# Altium PCB NB3000XN.PcbDoc (part 43 of 71)
Units mil, origin at the board's own origin, x right, y up, seen from the top; angles counter-clockwise.
Board outline 9527.56 x 6929.77 mil, 6 copper layers (Top Layer, GND+SHIELD, MidLayer1, MidLayer2, P2 - 3V3+5V0, Bottom Layer), stack 62.375 mil thick; 832 components, 1027 nets, 4655 pads, 4981 vias.
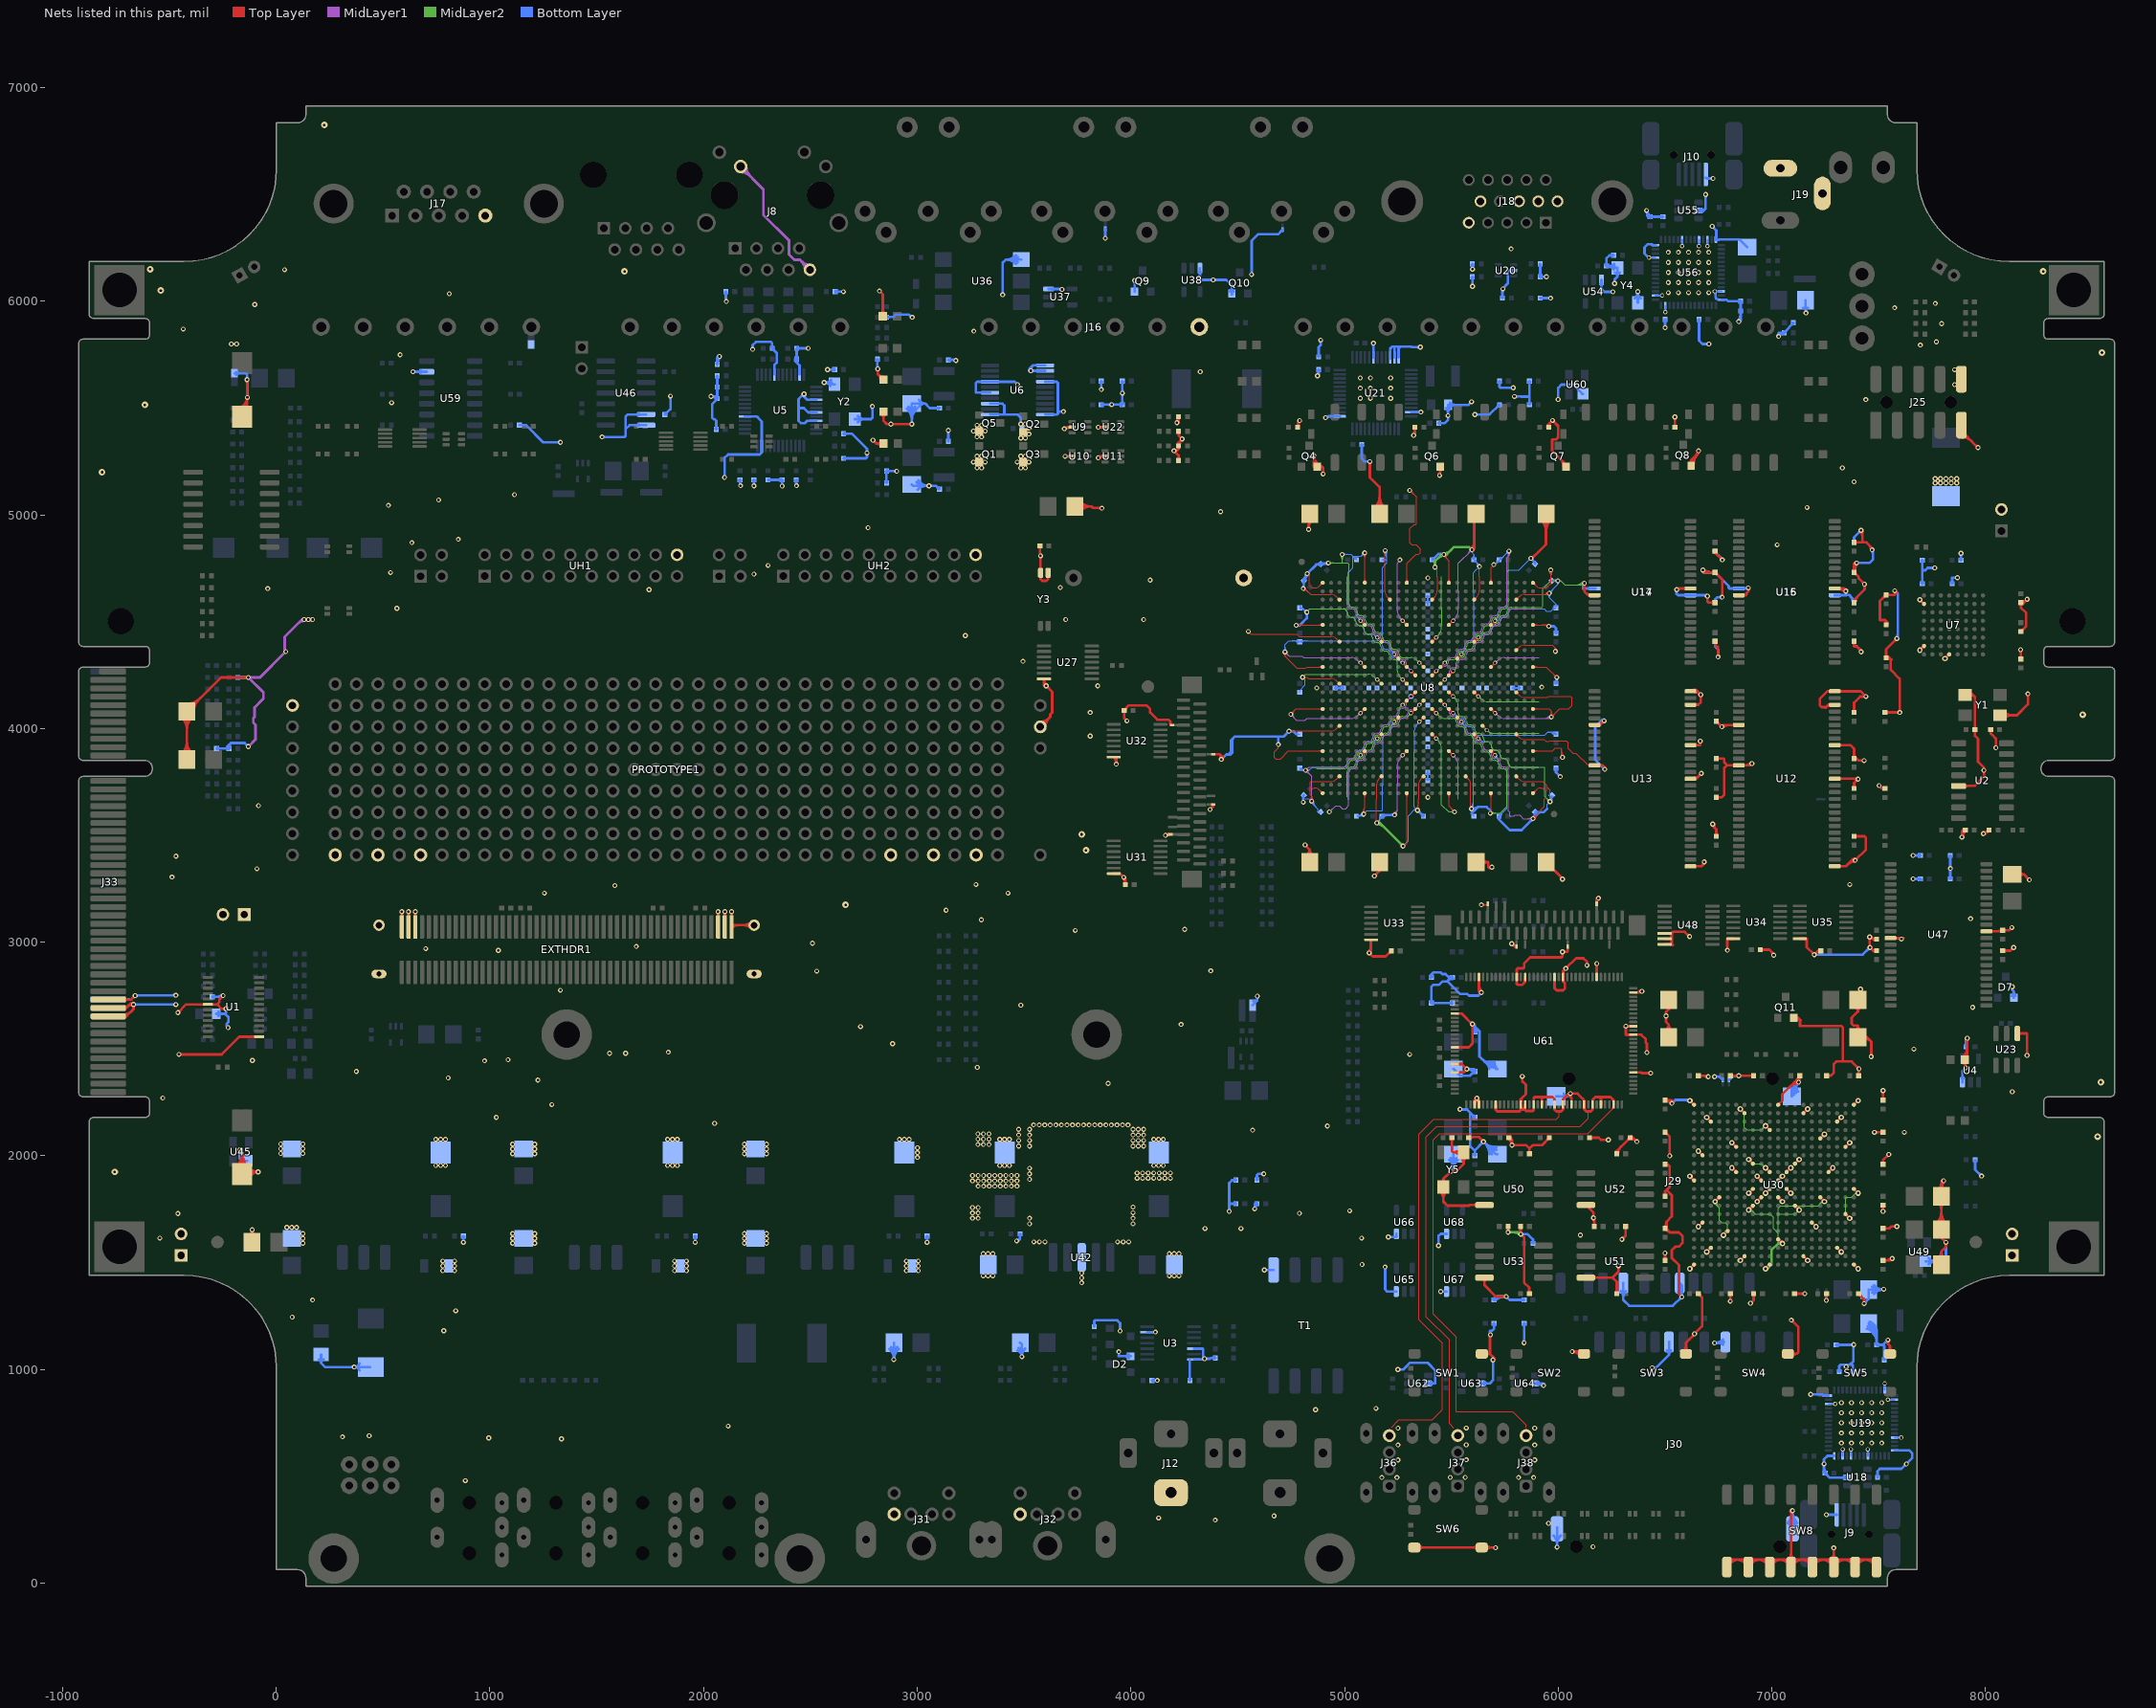
[diagram p47: the nets of this part, all layers, seen from the top]

## Via types
v1: diameter 23, hole 11.81, Top Layer to Bottom Layer, 3672 vias
v2: diameter 26, hole 11.81, Top Layer to Bottom Layer, 461 vias
v3: diameter 19, hole 11.81, Top Layer to Bottom Layer, tented both sides, 396 vias
v4: diameter 23.62, hole 11.81, Top Layer to Bottom Layer, 288 vias
v5: diameter 20, hole 11.81, Top Layer to Bottom Layer, 91 vias
v6: diameter 23, hole 11.81, Top Layer to Bottom Layer, tented both sides, 50 vias
v7: diameter 31, hole 11.81, Top Layer to Bottom Layer, 15 vias
v8: diameter 27.56, hole 11.81, Top Layer to Bottom Layer, tented both sides, 4 vias
v9: diameter 29, hole 11.81, Top Layer to Bottom Layer, 3 vias
v10: diameter 21, hole 11.81, Top Layer to Bottom Layer, 1 vias

## Nets (pads, with @x,y where several pads share a name; then routed paths per layer and width w, separated by ;. In a path a pad name is that pad's centre, name@x,y a point inside that pad or via, vN(x,y) a via of type N, cw(c..) or ccw(c..) an arc to the next point about the centre after c; other vN are vias at no path point) (continued)
GND: (continued)
  Top Layer w12: v1@7428.36,4676.04 ccw(c7415.08,4676.04) 7424.47,4685.43 ccw(c7433.86,4694.82) v1@7433.86,4681.54 ; 7428.54,110.71 cw(c7428.54,40.04) SW8.8@7478.51,90.01 ; v1@7429.97,4672.15 cw(c7420.58,4662.76) 7433.86,4662.76 cw(c7447.14,4662.76) v1@7437.75,4672.15 ; 7430.75,4159.56 cw(c7421.23,4150.04) v1@7434.69,4150.04 ; 7430.93,4159.38 ccw(c7440.19,4168.64) v1@7440.19,4155.54 ; C201.2@7435.5,2547.45 cw(c7445,2545.25) 7445,2555 ; C201.2@7435.5,2562.55 ccw(c7445,2564.75) 7445,2555 ; v1@7436.3,4146.15 ccw(c7426.91,4136.76) 7426.91,4150.04 ccw(c7426.91,4163.32) v1@7436.3,4153.93 ; v1@7453.64,3020.49 cw(c7444.25,3011.1) 7457.52,3011.1 cw(c7470.8,3011.1) v1@7461.41,3020.49 ; 7454.4,4859.83 cw(c7431.17,4836.6) v1@7464.02,4836.6 ; 7457.51,110.71 cw(c7457.51,69.01) SW8.8@7487,98.5 ; 7457.52,2992.34 ccw(c7476.49,2992.34) v1@7463.08,2978.93 ; v1@7457.73,3018.88 cw(c7458.78,2990.3) C156.2@7479,3010.52 ; v1@7461.3,2468.6 ccw(c7451.91,2477.99) 7465.19,2477.99 ccw(c7478.47,2477.99) v1@7469.08,2468.6 ; v1(7465.19,2464.71) 7465.19,2534.81 7445,2555 ; v1@7465.19,3024.33 7475.19,3014.33 C156.2@7490,3014.33 ; v1@7465.19,3024.37 v1(7457.52,3024.37) 7457.52,2976.71 v1(7459.19,2975.04) 7463.52,2975.04 7465.19,2973.37 7465.19,2969 7473.52,2960.67 C155.2@7490,2960.67 ; v1(7469.52,4836.6) 7469.52,4844.71 7442.86,4871.37 7423.52,4871.37 ; v4(7480,2110) 7479.33,2110.67 7480,2110.67 C234.2@7520,2110.67 ; v4@7484.11,2105.89 cw(c7495.64,2094.36) 7495.64,2110.67 ; v4@7484.11,2114.11 ccw(c7492.41,2122.41) 7492.41,2110.67 ; C155.2@7485.89,2956.56 ccw(c7475.97,2946.64) 7475.97,2960.67 ccw(c7475.97,2974.7) C155.2@7485.89,2964.78 ; C156.2@7485.89,3010.22 ccw(c7475.97,3000.3) 7475.97,3014.33 ccw(c7475.97,3028.36) C156.2@7485.89,3018.44 ; SW8.8@7490,110.71 7390,110.71 SW8.6@7290,110.71 ; v1(7501.86,3733.37) v1@7505.19,3730.04 ; v1@7505.19,3729.96 7515.19,3719.96 R157.1@7530,3719.96 ; v4@7515.89,1744.11 ccw(c7505.97,1754.03) 7520,1754.03 ccw(c7534.03,1754.03) v4@7524.11,1744.11 ; C195.2@7515.89,1765.22 cw(c7505.97,1755.3) 7520,1755.3 cw(c7534.03,1755.3) C195.2@7524.11,1765.22 ; C194.2@7515.89,1964.78 ccw(c7505.97,1974.7) 7520,1974.7 ccw(c7534.03,1974.7) C194.2@7524.11,1964.78 ; C234.2@7515.89,2106.56 ccw(c7505.97,2096.64) 7505.97,2110.67 ccw(c7505.97,2124.7) C234.2@7515.89,2114.78 ; C218.2@7515.89,2264.78 ccw(c7505.97,2274.7) 7520,2274.7 ccw(c7534.03,2274.7) C218.2@7524.11,2264.78 ; v4@7515.89,2300.89 cw(c7505.97,2290.97) 7520,2290.97 cw(c7534.03,2290.97) v4@7524.11,2300.89 ; C236.2@7520,1510.67 7554.82,1510.67 v1(7563.52,1519.37) ; C220.2@7520,1660.67 7549.98,1660.67 7559.31,1670 v4(7585,1670) ; v4(7520,1740) C195.2@7520,1769.33 ; C194.2@7520,1960.67 7520,1978.71 v4(7547.7,2006.4) v4@7547.7,2002.7 ; C218.2@7520,2260.67 v4(7520,2305) ; C236.2@7524.11,1506.56 cw(c7534.03,1496.64) 7534.03,1510.67 cw(c7534.03,1524.7) C236.2@7524.11,1514.78 ; C220.2@7524.11,1656.56 cw(c7534.03,1646.64) 7534.03,1660.67 cw(c7534.03,1674.7) C220.2@7524.11,1664.78 ; C58.2@7525.08,4615.75 ccw(c7515.16,4625.67) C58.2@7529.19,4625.67 ; C58.2@7525.08,4615.75 cw(c7535,4605.83) C58.2@7535,4619.86 ; R157.1@7525.75,3716.2 ccw(c7516.67,3707.12) 7516.67,3719.96 ccw(c7516.67,3732.8) R157.1@7525.75,3723.72 ; C236.2@7529.23,1510.67 ccw(c7529.23,1553.67) v1@7559.64,1523.26 ; R155.1@7530,4076.18 7578.72,4076.18 7579.86,4075.04 v1(7598.52,4075.04) 7598.52,4233.37 7556.86,4275.04 7556.86,4325 7551.19,4330.67 C60.2@7535,4330.67 7535,4371.18 v1(7585.19,4421.37) ; C60.2@7530.89,4334.78 ccw(c7520.97,4344.7) 7535,4344.7 ccw(c7549.03,4344.7) 7539.11,4334.78 ccw(c7549.03,4344.7) 7549.03,4330.67 ccw(c7549.03,4316.64) C60.2@7539.11,4326.56 ; C59.2@7530.89,4489.78 ccw(c7520.97,4499.7) 7535,4499.7 ccw(c7549.03,4499.7) C59.2@7539.11,4489.78 ; C60.2@7532,4336.08 cw(c7538.52,4324.33) 7548.03,4333.83 ; C60.2@7533.57,4336.69 cw(c7537.55,4319.91) 7549.75,4332.1 ; R155.1@7534.25,4072.42 cw(c7543.33,4063.34) 7543.33,4076.18 cw(c7543.33,4089.02) R155.1@7534.25,4079.94 ; C59.2@7535,4485.67 7535,4503.04 7529.67,4508.37 7507.19,4508.37 7506.19,4509.37 7506.19,4597.04 7521.19,4612.04 7521.56,4612.04 7521.56,4612.23 C58.2@7535,4625.67 7572.9,4625.67 7578.23,4631 ; 7536.04,4502 cw(c7522.72,4488.69) C59.2@7541.01,4484.19 ; C60.2@7537.82,4325.59 cw(c7546.55,4309.85) 7559.28,4322.58 ; C58.2@7539.11,4621.56 cw(c7549.03,4611.64) 7549.03,4625.67 cw(c7549.03,4639.7) C58.2@7539.11,4629.78 ; v4@7541.88,2006.4 cw(c7527.86,2006.4) 7537.78,1996.48 cw(c7547.7,1986.56) v4@7547.7,2000.59 ; U47.12@7555.59,3019.25 7606.86,3019.25 7615.65,3019.25 7615.65,3019.04 7615.52,3019.04 7609.19,3012.71 7606.86,3010.37 v1(7606.86,3015.04) ; v1(7575.52,4645.04) 7581.86,4638.71 7581.86,4634.71 7578.23,4631.08 ; v1@7579.69,4421.37 cw(c7566.41,4421.37) 7575.8,4411.99 cw(c7585.19,4402.6) v1@7585.19,4415.87 ; v4@7580.89,1665.89 ccw(c7570.97,1655.97) 7570.97,1670 ccw(c7570.97,1684.03) v4@7580.89,1674.11 ; 7583.41,3019.25 cw(c7583.41,2991.6) v1@7602.97,3011.15 ; v1@7594.64,4071.15 ccw(c7585.25,4061.76) 7585.25,4075.04 ccw(c7585.25,4088.32) 7594.64,4078.93 ccw(c7585.25,4088.32) 7598.52,4088.32 ccw(c7611.8,4088.32) v1@7602.41,4078.93 ; C200.2@7769.4,1682.53 ccw(c7712.43,1739.5) 7792.99,1739.5 ; C203.2@7776.12,1522.73 ccw(c7758.86,1552.17) 7792.99,1552.17 ; C190.2@7776.12,1842.73 ccw(c7758.86,1872.17) 7792.99,1872.17 ; C200.2@7777.88,1674.05 ccw(c7741.4,1710.53) 7792.99,1710.53 ccw(c7844.58,1710.53) C200.2@7808.1,1674.05 ; C190.2@7780.37,1775.17 cw(c7772.69,1756.38) 7792.99,1756.38 ; C203.2@7792.99,1490 7792.99,1552.18 ; 7792.99,1739.5 ccw(c7873.55,1739.5) C200.2@7816.59,1682.53 ; C190.2@7792.99,1843.06 cw(c7844.5,1843.06) v1@7808.08,1879.49 ; 7792.99,1872.03 cw(c7815.53,1872.03) v1@7799.59,1887.97 ; v1(7804.19,1883.37) 7792.99,1872.18 ; C190.2@7805.62,1775.17 ccw(c7813.3,1756.38) 7792.99,1756.38 ; v1@7809.69,1595.04 ccw(c7796.41,1595.04) 7805.8,1604.43 ccw(c7815.19,1613.82) v1@7815.19,1600.54 ; C203.2@7809.87,1522.73 cw(c7827.12,1552.17) 7792.99,1552.17 ; C190.2@7809.87,1842.73 cw(c7827.12,1872.17) 7792.99,1872.17 ; v1@7811.3,1591.15 cw(c7801.91,1581.76) 7815.19,1581.76 cw(c7828.47,1581.76) v1@7819.08,1591.15 ; U2.5@7874.17,3731.34 7948.52,3731.34 7992.52,3775.34 v1(7992.52,3804.71) 7992.52,3817.48 7981.46,3828.54 7981.28,3828.54 7965.19,3844.64 7965.19,3952.04 7950.86,3966.37 ; v1@7886.3,3495.6 ccw(c7876.91,3504.99) 7890.19,3504.99 ccw(c7903.47,3504.99) v1@7894.08,3495.6 ; J25.9@7886.99,5363.75 cw(c7886.99,5293.12) 7936.93,5343.07 ; J25.9@7886.99,5375.75 cw(c7886.99,5334.1) 7916.45,5363.55 ; J25.9@7886.99,5420.25 7886.99,5393.01 v4(7965,5315) ; v1@7890.19,3488.16 cw(c7926.6,3488.16) C35.2@7908.82,3519.93 ; v1@7890.19,3502.67 cw(c7906.72,3502.67) C35.2@7906.17,3519.19 ; 7890.19,3508.63 cw(c7915.14,3508.63) C35.2@7902.95,3530.4 ; 7890.19,3515.08 cw(c7906.31,3515.08) C35.2@7905.77,3531.19 ; v1@7890.52,3491.71 v1(7890.19,3491.71) 7890.19,3509.21 C35.2@7905.98,3525 ; LED1.2@7893.79,2440.32 cw(c7870.43,2416.96) 7903.47,2416.96 cw(c7936.5,2416.96) LED1.2@7913.14,2440.32 ; LED1.2@7893.79,2459.68 ccw(c7842.92,2510.54) 7914.86,2510.54 ; C35.2@7900.17,3525 cw(c7886.14,3525) 7896.06,3515.08 cw(c7905.98,3505.16) C35.2@7905.98,3519.19 ; U2.5@7901.33,3725.84 cw(c7914.61,3712.56) 7914.61,3731.34 cw(c7914.61,3750.12) U2.5@7901.33,3736.84 ; LED1.2@7902.27,2451.19 ccw(c7871.9,2481.57) 7914.86,2481.57 ; LED1.2@7903.47,2433.51 ccw(c7928.32,2433.51) v1@7910.75,2415.93 ; Y1.4@7904.88,4157.5 7940.34,4157.5 ; J25.9@7905.99,5382.75 ccw(c7927.11,5382.75) 7912.18,5367.82 ; v1(7906.86,2412.04) 7906.86,2413.37 7903.52,2416.71 7903.47,2416.71 LED1.2@7903.47,2450 7914.86,2461.39 v1(7914.86,2550.71) ; Y1.4@7907.14,4159.3 cw(c7922.84,4143.06) 7938.8,4159.03 ; Y1.4@7907.7,4159.71 cw(c7921.98,4132.88) 7943.47,4154.37 ; v1@7910.97,2546.82 cw(c7901.58,2537.43) 7914.86,2537.43 cw(c7928.14,2537.43) v1@7918.75,2546.82 ; Y1.4@7915.48,4150.67 cw(c7931.32,4134.29) 7947.43,4150.4 ; Y1.4@7928.91,4149.69 cw(c7940.33,4145.24) 7940.33,4157.5 ; Y1.4@7928.91,4165.31 ccw(c7940.33,4169.76) 7940.33,4157.5 ; C33.2@7946.56,3999.11 ccw(c7936.64,4009.03) 7950.67,4009.03 ccw(c7964.7,4009.03) C33.2@7954.78,3999.11 ; v4@7959.19,5315 ccw(c7945.16,5315) 7955.08,5324.92 ccw(c7965,5334.84) v4@7965,5320.81 ; v1@7988.64,3800.82 cw(c7979.25,3791.43) 7992.52,3791.43 cw(c8005.8,3791.43) v1@7996.41,3800.82 ; v1@7990.19,3505.04 v1(7990.19,3508.37) 8000.53,3508.37 R30.2@8017.15,3525 ; v1@7990.2,3513.87 ccw(c7990.29,3551.85) R30.2@8017.15,3525 ; U47.34@8004.41,3050.75 8075.08,3050.75 C153.2@8080,3055.67 8110.82,3055.67 v1(8123.52,3068.37) ; R30.2@8007.23,3515.08 cw(c8017.15,3505.16) R30.2@8017.15,3519.19 ; R30.2@8008.42,3516.27 ccw(c8000.18,3524.51) R30.2@8011.83,3524.51 ; C34.2@8020.22,3990.89 cw(c8010.3,3980.97) 8024.33,3980.97 cw(c8038.36,3980.97) C34.2@8028.44,3990.89 ; C34.2@8024.33,3995 8024.33,3977.37 8031.66,3970.04 8031.86,3970.04 8048.52,3953.37 v1(8048.52,3910) ; v1@8044.64,3913.89 ccw(c8035.25,3923.28) 8048.52,3923.28 ccw(c8061.8,3923.28) v1@8052.41,3913.89 ; 8054.09,3050.75 ccw(c8054.09,3081.58) C153.2@8075.89,3059.78 ; Y1.2@8067.88,4062.5 8147.5,4062.5 8198.52,4113.52 v1(8198.52,4162.37) ; C154.2@8080,2960.67 8117.49,2960.67 v1(8131.86,2975.04) ; C154.2@8084.11,2956.56 cw(c8094.03,2946.64) 8094.03,2960.67 cw(c8094.03,2974.7) C154.2@8084.11,2964.78 ; C153.2@8084.11,3051.56 cw(c8094.03,3041.64) 8094.03,3055.67 cw(c8094.03,3069.7) C153.2@8084.11,3059.78 ; Y1.2@8087.08,4047.3 cw(c8123.78,4010.59) 8123.78,4062.5 cw(c8123.78,4114.41) Y1.2@8087.08,4077.7 ; C36.2@8125,3317.99 8178.91,3317.99 ; U23.1@8151.81,2570 U23.1@8149,2572.81 8192.19,2572.81 8195,2570 v4(8195,2470) ; U23.1@8153.81,2568.01 cw(c8165.41,2556.4) 8165.41,2572.81 cw(c8165.41,2589.22) U23.1@8153.81,2577.62 ; C36.2@8159.76,3305.21 cw(c8178.9,3297.27) 8178.9,3317.99 ; C36.2@8159.76,3330.78 ccw(c8178.9,3338.72) 8178.9,3317.99 ; v1@8160.64,4365.49 cw(c8150.1,4354.95) 8165,4354.95 ; C57.2@8160.89,4329.78 ccw(c8150.97,4339.7) 8165,4339.7 ccw(c8179.03,4339.7) C57.2@8169.11,4329.78 ; C55.2@8160.89,4585.22 cw(c8150.97,4575.3) 8165,4575.3 cw(c8179.03,4575.3) 8169.11,4585.22 cw(c8179.03,4575.3) 8179.03,4589.33 cw(c8179.03,4603.36) C55.2@8169.11,4593.44 ; C55.2@8164.25,4583.19 ccw(c8166.2,4599.17) 8177.59,4587.79 ; v1(8164.52,4369.37) 8165,4370.04 8165,4369.37 C57.2@8165,4325.67 ; 8165,4357.25 cw(c8176.65,4357.25) v1@8168.41,4365.49 ; C55.2@8165.71,4595.1 ccw(c8170,4630.19) v1(8195,4605.19) 8179.14,4589.33 C55.2@8165,4589.33 8165,4566.71 8165.19,4566.71 8190.19,4541.71 8190.19,4479.37 8190.04,4479.37 8185.71,4475.04 ; C56.2@8174.82,4464 ccw(c8184.48,4454.33) 8170.81,4454.33 cw(c8184.84,4454.33) 8174.92,4464.25 cw(c8165,4474.17) 8165,4460.14 ccw(c8165,4474.53) C56.2@8175.17,4464.35 ; v4@8190.89,2474.11 ccw(c8180.97,2484.03) 8195,2484.03 ccw(c8209.03,2484.03) v4@8199.11,2474.11 ; v1@8194.64,4158.49 cw(c8185.25,4149.1) 8198.52,4149.1 cw(c8211.8,4149.1) v1@8202.41,4158.49 ; v1@8199.69,3291.71 ccw(c8186.41,3291.71) 8195.8,3301.1 ccw(c8205.19,3310.49) v1@8205.19,3297.21 ; v1(8205.19,3291.71) 8178.91,3317.99 ; -701.48,2652.86 -668.14,2686.19 v1(-668.14,2708.37) -685.48,2708.37 ; -701.48,2692.23 -701.48,2692.37 -685.48,2708.37 ; -159.72,2016.62 -159.72,1935.99 -148.78,1925.04 v1(-84.81,1925.04) ; 4223.82,5308.37 R93.1@4223.82,5323.33 4223.82,5339 v1(4240.19,5355.37) ; 4418.86,3876 4423.52,3871.33 v1(4423.52,3855.71) 4418.86,3860.37 4418.86,3876 ; Y5.2@5462.5,1855.99 5465.19,1858.68 Y5.2@5462.5,1858.68 ; Y5.2@5462.5,1855.99 Y5.2@5462.5,1858.68 ; Y5.2@5462.5,1858.68 5462.5,1892.02 ; 5462.5,1892.02 v1(5498.52,1928.04) 5523.52,1928.04 5557.5,1962.02 ; 5508.5,2016.5 Y5.4@5557.5,2016.5 5557.5,1962.02 ; U61.3@5609.37,2253.19 ccw(c5601.4,2270) v4(5620,2270) ccw(c5640.12,2270) U61.4@5629.06,2253.19 ; U61.3@5609.37,2253.19 cw(c5620,2248.92) v4@5620,2260.37 ; U61.3@5609.37,2253.19 cw(c5620,2248.92) v4@5620,2260.37 ; v4@5620,2260.37 cw(c5620,2251.08) U61.4@5629.05,2253.19 ; v4@5620,2260.37 cw(c5620,2251.08) U61.4@5629.05,2253.19 ; 5823.52,2211.95 5825.91,2214.33 ; 5823.52,2211.95 5825.91,2214.33 ; 5825.91,2214.33 5827.91,2216.33 ; 5827.91,2216.33 5843.59,2216.33 ; 5843.59,2216.33 5845.59,2214.33 ; 5845.59,2214.33 5849.54,2210.37 5881.86,2210.37 5884.96,2213.48 U61.17@5884.96,2240 5884.96,2269.81 5890.19,2275.04 5924.33,2275.04 ; 5864.6,1382.45 5865.52,1383.37 5865.67,1383.37 5865.67,1381.37 ; 5864.6,1382.45 5865.67,1381.37 ; 5865.67,2034.54 5869.84,2038.71 ; 5924.33,2275.04 5974.52,2275.04 5981.86,2267.71 5981.86,2218.24 5983.39,2216.71 ; C279.2@5943.52,3374.47 5943.52,3375 C279.2@5942.99,3375 C279.2@5943.52,3374.47 ; 5983.39,2216.71 5991.72,2208.37 6005,2208.37 6014.42,2208.37 6022.76,2216.71 ; 6022.76,2216.71 6022.76,2265.37 6049.09,2291.71 v1(6056.86,2291.71) ; 6160.55,2216.71 6160.55,2261.4 6174.19,2275.04 ; 6174.19,2275.04 6174.86,2275.71 6190.92,2275.71 6191.59,2275.04 ; 6174.19,2275.04 6191.59,2275.04 ; 6316.52,2567.57 v1@6316.52,2606.94 ; v1@6316.52,2606.94 6316.42,2606.94 v1(6316.52,2607.04) v1@6316.52,2606.94 ; 6375,2764.42 v1@6380.62,2770.04 ; 6500.19,1833.37 6506.86,1840.04 6531.86,1815.04 6531.86,1716.71 6506.86,1691.71 6506.86,1660.67 C246.2@6506.86,1658.37 ; 6500.19,1833.37 6522.19,1855.37 6522.19,1950.33 6511.86,1960.67 ; C246.2@6502.29,1658.37 C246.2@6506.86,1653.81 ; C246.2@6502.29,1658.37 C246.2@6500,1660.67 6500,1658.37 C246.2@6502.29,1658.37 ; C246.2@6502.29,1658.37 C246.2@6506.86,1658.37 ; v4(6505,2655) 6505,2672.99 6517.01,2685 ; C246.2@6506.86,1653.81 6515.19,1645.48 6515.19,1645.37 6506.86,1653.71 C246.2@6506.86,1653.81 ; C246.2@6506.86,1653.81 C246.2@6506.86,1658.37 ; 6531.97,3016.02 6531.97,3041.61 ; 6531.97,3041.61 6538.73,3048.37 ; 6622.4,5255.04 6622.52,5255.04 v1@6656.86,5289.37 ; 7123.52,2645.79 7131.86,2637.45 7131.86,2608.37 7324.86,2608.37 7331.86,2601.37 7331.86,2441.71 ; 7290.19,2390 7290.19,2430.37 7301.52,2441.71 7331.86,2441.71 ; 7331.86,2441.71 7373.52,2441.71 v1(7407.86,2407.37) v1@7413.34,2407.37 ; 7402.99,2608.37 C201.2@7402.99,2555 7445,2555 ; 7402.99,2608.37 7401.99,2609.37 7381.86,2609.37 7373.52,2617.71 7373.52,2646.37 7402.86,2675.71 7402.99,2675.71 ; C58.2@7529.19,4625.67 cw(c7515.6,4625.67) 7525.21,4616.06 ccw(c7515.6,4625.67) C58.2@7529.19,4625.67 ; C58.2@7535,4619.86 ccw(c7535,4605.39) 7524.77,4615.62 cw(c7535,4605.39) C58.2@7535,4619.86 ; 7792.99,1552.18 7815.19,1574.37 v1(7815.19,1595.04) 7792.99,1617.24 C200.2@7792.99,1655 7792.99,1755.37 7791.99,1755.37 7792.99,1756.37 ; 7792.99,1756.37 C190.2@7792.99,1810 7792.99,1872.18 ; 7940.34,4157.5 7950.67,4147.17 C33.2@7950.67,3995 ; 7950.67,3966.56 C33.2@7950.67,3995 ; 7950.67,3966.56 C33.2@7950.67,3995 ; 7950.67,3966.56 7950.67,3966.37 7950.86,3966.37 ; 7950.67,3966.56 7950.86,3966.37 ; 7950.67,3980.97 cw(c7964.7,3980.97) 7954.78,3990.89 ccw(c7964.7,3980.97) 7950.67,3980.97 ; 7950.67,3980.97 ccw(c7936.64,3980.97) 7946.56,3990.89 cw(c7936.64,3980.97) 7950.67,3980.97 ; 8185.71,4475.04 C56.2@8165,4454.33 8165,4454.18 8165.07,4454.26 8185.86,4475.04 8185.71,4475.04
  MidLayer1 w4: v1@4721.19,4348.87 cw(c4721.19,4325.94) 4737.41,4342.16 cw(c4753.63,4358.37) v1@4730.69,4358.37 ; v1@4721.19,4352.87 cw(c4721.19,4339.6) 4730.58,4348.99 cw(c4739.97,4358.37) v1@4726.69,4358.37 ; v1(4721.19,4358.37) 4741.56,4338 4802.63,4338 4808.65,4331.97 4860,4331.97 4870,4331.97 5031.66,4331.97 cw(c5031.66,4290.24) 5061.17,4319.75 ; v1@4748.52,4057.21 cw(c4748.52,4034.27) 4764.74,4050.49 cw(c4780.96,4066.71) v1@4758.02,4066.71 ; v1@4748.52,4061.21 cw(c4748.52,4047.93) 4757.91,4057.32 cw(c4767.3,4066.71) v1@4754.02,4066.71 ; v1(4748.52,4066.71) 4776.02,4039.21 4815.83,4039.21 4824.65,4048.03 4860,4048.03 4870,4048.03 4918.62,4048.03 4938.04,4048.03 5012.16,4048.03 ; v1@4817.86,3795.54 cw(c4817.86,3772.61) 4834.07,3788.82 cw(c4850.29,3805.04) v1@4827.36,3805.04 ; v1@4817.86,3799.54 cw(c4817.86,3786.26) 4827.25,3795.65 cw(c4836.64,3805.04) v1@4823.36,3805.04 ; v1@4839.47,3666.76 ccw(c4823.26,3682.98) 4846.19,3682.98 ccw(c4869.13,3682.98) v1@4852.91,3666.76 ; v1@4842.3,3663.93 ccw(c4832.91,3673.32) 4846.19,3673.32 ccw(c4859.47,3673.32) v1@4850.08,3663.93 ; v1(4846.19,3660.04) 4846.19,3776.71 v1(4817.86,3805.04) 4832.88,3820.07 4855.26,3820.07 4860,3820.07 4870,3820.07 4879.78,3820.07 4938.04,3820.07 4996.3,3820.07 ccw(c4996.3,3835.67) 5011.9,3835.67 cw(c5035.67,3835.67) 5035.67,3859.44 ccw(c5035.67,3875.04) 5051.27,3875.04 cw(c5075.04,3875.04) 5075.04,3898.81 ccw(c5075.04,3914.41) 5090.64,3914.41 cw(c5114.41,3914.41) 5114.41,3938.18 ccw(c5114.41,3953.78) 5130.01,3953.78 cw(c5153.78,3953.78) 5153.78,3977.55 ccw(c5153.78,3993.15) 5169.38,3993.15 cw(c5193.15,3993.15) 5193.15,4016.92 ccw(c5193.15,4032.52) 5208.75,4032.52 cw(c5232.52,4032.52) 5232.52,4056.29 ccw(c5232.52,4071.89) 5248.12,4071.89 cw(c5271.89,4071.89) 5271.89,4095.66 ccw(c5271.89,4111.26) 5287.49,4111.26 ; v1(4928.86,3609.71) 4929.77,3609.71 4957.94,3637.87 4977.13,3637.87 4990,3625 5005,3625 5020.07,3640.07 5020.07,3660 5020.07,3670 5020.07,3679.78 5020.07,3738.04 5020.07,3796.3 cw(c5035.67,3796.3) 5035.67,3811.9 ccw(c5035.67,3835.67) 5059.44,3835.67 cw(c5075.04,3835.67) 5075.04,3851.27 ccw(c5075.04,3875.04) 5098.81,3875.04 cw(c5114.41,3875.04) 5114.41,3890.64 ccw(c5114.41,3914.41) 5138.18,3914.41 cw(c5153.78,3914.41) 5153.78,3930.01 ccw(c5153.78,3953.78) 5177.55,3953.78 cw(c5193.15,3953.78) 5193.15,3969.38 ccw(c5193.15,3993.15) 5216.92,3993.15 cw(c5232.52,3993.15) 5232.52,4008.75 ccw(c5232.52,4032.52) 5256.29,4032.52 cw(c5271.89,4032.52) 5271.89,4048.12 ccw(c5271.89,4071.89) 5295.66,4071.89 cw(c5311.26,4071.89) 5311.26,4087.49 ; v1@4928.86,3615.21 ccw(c4928.86,3630.7) 4939.81,3619.75 ; v1@4928.86,3619.21 ccw(c4928.86,3644.36) 4946.64,3626.57 ; v1@4934.36,3609.71 cw(c4945.42,3609.71) 4937.6,3617.53 ; v1@4938.36,3609.71 cw(c4959.08,3609.71) 4944.43,3624.36 ; 4998.23,4048.03 5012.16,4048.03 ; 5011.9,4710 5011.9,4700.22 5011.9,4641.96 5011.9,4583.7 ccw(c5035.67,4583.7) 5035.67,4559.93 cw(c5035.67,4544.33) 5051.27,4544.33 ccw(c5075.04,4544.33) 5075.04,4520.56 cw(c5075.04,4504.96) 5090.64,4504.96 ccw(c5114.41,4504.96) 5114.41,4481.19 cw(c5114.41,4465.59) 5130.01,4465.59 ccw(c5153.78,4465.59) 5153.78,4441.82 cw(c5153.78,4426.22) 5169.38,4426.22 ccw(c5193.15,4426.22) 5193.15,4402.45 cw(c5193.15,4386.85) 5208.75,4386.85 ccw(c5232.52,4386.85) 5232.52,4363.08 cw(c5232.52,4347.48) 5248.12,4347.48 ccw(c5271.89,4347.48) 5271.89,4323.71 cw(c5271.89,4308.11) 5287.49,4308.11 ccw(c5311.26,4308.11) 5294.45,4291.3 5300.87,4283.57 ; v3@5067.57,4072.54 cw(c5049.53,4074.12) 5061.17,4060.25 ; v3@5067.57,4307.46 ccw(c5049.53,4305.88) 5061.17,4319.75 ; v3@5074.39,4064.42 ccw(c5072.81,4046.38) 5061.17,4060.25 ; v3@5074.39,4315.58 cw(c5072.81,4333.62) 5061.17,4319.75 ; v1@5234.52,3604.37 5248.03,3617.88 ; v1@5235.95,3596.51 cw(c5247.29,3600.25) 5238.84,3608.69 ; v1@5239.75,3597.76 cw(c5254.19,3602.53) 5243.44,3613.29 ; v1@5243.55,3599.02 cw(c5261.1,3604.81) 5248.03,3617.88 ; 5248.03,3798.23 5248.03,3812.16 ; 5248.03,4581.77 5248.03,4567.84 ; 5251.36,4775.54 ccw(c5247.01,4779.89) v1@5251.8,4783.74 ; 5253.78,4777.97 cw(c5259.19,4772.56) v1@5259.19,4780.21 ; 5254.5,4778.69 ccw(c5250.5,4782.7) v1@5254.91,4786.26 ; v1(5259.19,4789.71) 5259.19,4783.37 5248.19,4772.37 5248.03,4772.37 5248.03,4724.74 5248.03,4720 5248.03,4710 5248.03,4661.38 5248.03,4641.96 5248.03,4567.84 ; v3@5264.42,3874.39 cw(c5246.38,3872.81) 5260.25,3861.17 ; v3@5264.42,4505.61 ccw(c5246.38,4507.19) 5260.25,4518.83 ; v3@5272.54,3867.57 ccw(c5274.12,3849.53) 5260.25,3861.17 ; v3@5272.54,4512.43 cw(c5274.12,4530.47) 5260.25,4518.83 ; 5287.4,4110.75 cw(c5326.07,4110.75) 5298.73,4138.1 ; v3@5303.87,4270.04 ccw(c5286.04,4273.19) 5300.87,4283.57 ; v3@5303.92,4150.63 cw(c5286.19,4150.63) 5298.73,4138.1 ; 5310.75,4087.4 ccw(c5310.75,4126.07) 5338.1,4098.73 ; v3@5311.26,4143.29 ccw(c5311.26,4125.56) 5298.73,4138.1 ; v3@5312.56,4276.13 cw(c5315.71,4293.96) 5300.87,4283.57 ; v3@5343.29,4111.26 cw(c5325.56,4111.26) 5338.1,4098.73 ; v3@5350.63,4103.92 ccw(c5350.63,4086.19) 5338.1,4098.73 ; v3@5429.37,4276.08 ccw(c5429.37,4293.81) 5441.9,4281.27 ; v3@5436.71,4268.74 cw(c5454.44,4268.74) 5441.9,4281.27 ; v3@5467.44,4103.87 cw(c5464.29,4086.04) 5479.13,4096.43 ; v3@5468.74,4236.71 ccw(c5468.74,4254.44) 5481.27,4241.9 ; 5468.74,4292.51 ccw(c5468.74,4308.11) 5484.34,4308.11 cw(c5508.11,4308.11) 5508.11,4331.88 ccw(c5508.11,4347.48) 5523.71,4347.48 cw(c5547.48,4347.48) 5547.48,4371.25 ccw(c5547.48,4386.85) 5563.08,4386.85 cw(c5586.85,4386.85) 5586.85,4410.62 ccw(c5586.85,4426.22) 5602.45,4426.22 cw(c5626.22,4426.22) 5626.22,4449.99 ccw(c5626.22,4465.59) 5641.82,4465.59 cw(c5665.59,4465.59) 5665.59,4489.36 ccw(c5665.59,4504.96) 5681.19,4504.96 cw(c5704.96,4504.96) 5704.96,4528.73 ccw(c5704.96,4544.33) 5720.56,4544.33 cw(c5744.33,4544.33) 5744.33,4568.1 ccw(c5744.33,4583.7) 5759.93,4583.7 5759.93,4641.96 5759.93,4700.22 5759.93,4710 5759.93,4720 5759.93,4724.74 5759.93,4800 5769.86,4809.93 ; 5469.25,4292.6 ccw(c5469.25,4253.93) 5441.9,4281.27 ; v3@5476.08,4229.37 cw(c5493.81,4229.37) 5481.27,4241.9 ; v3@5476.13,4109.96 ccw(c5493.96,4106.81) 5479.13,4096.43 ; 5492.51,4268.74 cw(c5508.11,4268.74) 5508.11,4284.34 ccw(c5508.11,4308.11) 5531.88,4308.11 cw(c5547.48,4308.11) 5547.48,4323.71 ccw(c5547.48,4347.48) 5571.25,4347.48 cw(c5586.85,4347.48) 5586.85,4363.08 ccw(c5586.85,4386.85) 5610.62,4386.85 cw(c5626.22,4386.85) 5626.22,4402.45 ccw(c5626.22,4426.22) 5649.99,4426.22 cw(c5665.59,4426.22) 5665.59,4441.82 ccw(c5665.59,4465.59) 5689.36,4465.59 cw(c5704.96,4465.59) 5704.96,4481.19 ccw(c5704.96,4504.96) 5728.73,4504.96 cw(c5744.33,4504.96) 5744.33,4520.56 ccw(c5744.33,4544.33) 5768.1,4544.33 cw(c5783.7,4544.33) 5783.7,4559.93 5841.96,4559.93 5900.22,4559.93 5910,4559.93 ; 5492.6,4269.25 cw(c5453.93,4269.25) 5481.27,4241.9 ; v3@5507.46,3867.57 cw(c5505.88,3849.53) 5519.75,3861.17 ; v3@5507.46,4512.43 ccw(c5505.88,4530.47) 5519.75,4518.83 ; v3@5515.58,3874.39 ccw(c5533.62,3872.81) 5519.75,3861.17 ; v3@5515.58,4505.61 cw(c5533.62,4507.19) 5519.75,4518.83 ; 5531.97,3670 5531.97,3738.04 5531.97,3812.16 5531.97,3831.66 ccw(c5490.24,3831.66) 5519.75,3861.17 ; 5531.97,4581.77 5531.97,4567.84 ; v1@5586.69,4837.04 cw(c5563.76,4837.04) 5579.97,4820.82 cw(c5596.19,4804.61) v1@5596.19,4827.54 ; v1@5590.69,4837.04 cw(c5577.41,4837.04) 5586.8,4827.65 cw(c5596.19,4818.26) v1@5596.19,4831.54 ; v1(5596.19,4837.04) 5531.86,4772.71 5531.86,4764.49 5531.97,4764.49 5531.97,4724.74 5531.97,4720 5531.97,4710 5531.97,4661.38 5531.97,4641.96 5531.97,4567.84 ; v3@5705.61,4064.42 cw(c5707.19,4046.38) 5718.83,4060.25 ; v3@5705.61,4315.58 ccw(c5707.19,4333.62) 5718.83,4319.75 ; v3@5712.43,4072.54 ccw(c5730.47,4074.12) 5718.83,4060.25 ; v3@5712.43,4307.46 cw(c5730.47,4305.88) 5718.83,4319.75 ; v1@5763.56,4823.93 cw(c5751.14,4809.93) 5769.86,4809.93 ; v1@5766.21,4826.92 cw(c5759.02,4818.82) 5769.86,4818.82 cw(c5780.69,4818.82) v1@5773.51,4826.92 ; 5768.1,3655.26 5768.1,3658.37 ; v1(5769.86,4831.04) 5769.86,4809.93 ; v1@5776.16,4823.93 ccw(c5788.57,4809.93) 5769.86,4809.93 ; 5781.77,4048.03 5767.84,4048.03 ; 5781.77,4331.97 5767.84,4331.97 ; v1@5875.81,3571.66 ccw(c5859.59,3555.44) 5859.59,3578.37 ccw(c5859.59,3601.31) v1@5875.81,3585.09 ; v1@5878.64,3574.49 ccw(c5869.25,3565.1) 5869.25,3578.37 ccw(c5869.25,3591.65) v1@5878.64,3582.26 ; v1(5882.52,3578.37) 5836.63,3578.37 5820,3595 5799.39,3595 5794.39,3590 5775,3590 5773.03,3591.97 5773.03,3608.29 5768.1,3613.21 5768.1,3660 5768.1,3670 ; 5910,4331.97 5861.38,4331.97 5841.96,4331.97 5767.84,4331.97 ; 5931.21,4048.03 ccw(c5931.21,4090.36) v1@5961.14,4060.43 ; 5940.86,4048.03 ccw(c5940.86,4080.7) v1@5963.97,4057.6 ; 5950.52,4048.03 ccw(c5950.52,4071.04) v1@5966.8,4054.77 ; v1(5967.86,4053.71) 5962.18,4048.03 5924.74,4048.03 5920,4048.03 5910,4048.03 5861.38,4048.03 5841.96,4048.03 5767.84,4048.03 ; 5012.16,4048.03 5031.66,4048.03 ccw(c5031.66,4089.76) 5061.17,4060.25 ; 5248.03,3617.88 5248.03,3655.26 5248.03,3660 5248.03,3670 5248.03,3718.62 5248.03,3738.04 5248.03,3812.16 ; 5248.03,3812.16 5248.03,3831.66 cw(c5289.76,3831.66) 5260.25,3861.17 ; 5248.03,4567.84 5248.03,4548.34 ccw(c5289.76,4548.34) 5260.25,4518.83 ; 5479.13,4096.43 5485.55,4088.7 cw(c5468.74,4071.89) 5492.51,4071.89 ccw(c5508.11,4071.89) 5508.11,4056.29 cw(c5508.11,4032.52) 5531.88,4032.52 ccw(c5547.48,4032.52) 5547.48,4016.92 cw(c5547.48,3993.15) 5571.25,3993.15 ccw(c5586.85,3993.15) 5586.85,3977.55 cw(c5586.85,3953.78) 5610.62,3953.78 ccw(c5626.22,3953.78) 5626.22,3938.18 cw(c5626.22,3914.41) 5649.99,3914.41 ccw(c5665.59,3914.41) 5665.59,3898.81 cw(c5665.59,3875.04) 5689.36,3875.04 ccw(c5704.96,3875.04) 5704.96,3859.44 cw(c5704.96,3835.67) 5728.73,3835.67 ccw(c5744.33,3835.67) 5744.33,3820.07 cw(c5744.33,3796.3) 5768.1,3796.3 5768.1,3738.04 5768.1,3710 ; 5519.75,4518.83 ccw(c5490.24,4548.34) 5531.97,4548.34 5531.97,4567.84 ; 5718.83,4060.25 ccw(c5748.34,4089.76) 5748.34,4048.03 5767.84,4048.03 ; 5718.83,4319.75 cw(c5748.34,4290.24) 5748.34,4331.97 5767.84,4331.97 ; 5768.1,3670 5768.1,3710 ; 5768.1,3670 5768.1,3679.78 5768.1,3710
  MidLayer1 w12: v1(-130.48,3915.37) -96.64,3949.21 -96.64,4017.28 -97.54,4018.18 ; v1@-130.48,3920.87 ccw(c-130.48,3934.15) -121.09,3924.76 ccw(c-111.7,3915.37) v1@-124.98,3915.37 ; v1@-130.48,4233.87 cw(c-130.48,4220.6) -121.09,4229.99 cw(c-111.7,4239.37) v1@-124.98,4239.37 ; v1@-126.59,4235.49 cw(c-117.2,4226.1) -117.2,4239.37 cw(c-117.2,4252.65) v1@-126.59,4243.26 ; -97.41,4018.31 -106.5,4027.4 -106.5,4048.91 -101.5,4053.91 -101.5,4098.91 -60,4140.41 -60,4168.9 v1(-130.48,4239.37) -75.63,4239.37 40,4355 40,4430 120,4510 v4(130,4510) v4(150,4510) v4(170,4510) ; 103.01,4493.01 cw(c130,4466.02) v4@130,4504.19 ; v4@134.11,4505.89 cw(c144.03,4495.97) 144.03,4510 cw(c144.03,4524.03) v4@134.11,4514.11 ; v4@145.89,4505.89 ccw(c135.97,4495.97) 135.97,4510 ccw(c135.97,4524.03) v4@145.89,4514.11 ; v4@154.11,4505.89 cw(c164.03,4495.97) 164.03,4510 cw(c164.03,4524.03) v4@154.11,4514.11 ; v4@165.89,4505.89 ccw(c155.97,4495.97) 155.97,4510 ccw(c155.97,4524.03) v4@165.89,4514.11 ; J8.10@2173.98,6604.67 cw(c2173.98,6542.17) 2218.18,6586.37 cw(c2262.38,6630.56) J8.10@2199.87,6630.56 ; J8.10@2173.98,6616.67 cw(c2173.98,6583.14) 2197.7,6606.85 cw(c2221.41,6630.56) J8.10@2187.87,6630.56 ; J8.10@2173.98,6630.56 2280,6524.55 2280,6405 2400,6285 2400,6219.54 2425,6194.54 2450.95,6194.54 J8.8@2498,6147.49 ; J8.8@2474.47,6147.49 ccw(c2417.67,6147.49) 2457.84,6187.66 ccw(c2498,6227.82) J8.8@2498,6171.02 ; v1(5234.52,3596.04) v1@5234.52,3604.37 ; v1(6683.52,3375.71) v1@6687.52,3379.71 ; v1(6766.19,4008.37) v1@6772.19,4008.37 ; v1@8125.19,2968.37 v1(8131.86,2975.04)
  MidLayer2 w4: v1(4803.86,4240.37) 4816.71,4253.23 4856.86,4253.23 ; v1(4823.52,4544.71) 4838.75,4559.93 4855.26,4559.93 4860,4559.93 4870,4559.93 4879.78,4559.93 4938.04,4559.93 4996.3,4559.93 cw(c4996.3,4544.33) 5011.9,4544.33 ccw(c5035.67,4544.33) 5035.67,4520.56 cw(c5035.67,4504.96) 5051.27,4504.96 ccw(c5075.04,4504.96) 5075.04,4481.19 cw(c5075.04,4465.59) 5090.64,4465.59 ccw(c5114.41,4465.59) 5114.41,4441.82 cw(c5114.41,4426.22) 5130.01,4426.22 ccw(c5153.78,4426.22) 5153.78,4402.45 cw(c5153.78,4386.85) 5169.38,4386.85 ccw(c5193.15,4386.85) 5193.15,4363.08 cw(c5193.15,4347.48) 5208.75,4347.48 ccw(c5232.52,4347.48) 5232.52,4323.71 cw(c5232.52,4308.11) 5248.12,4308.11 ; v1(4846.19,3660.04) v1@4847.74,3661.59 ; 4855.26,4253.23 4860,4253.23 4870,4253.23 4997.36,4253.23 5016.78,4253.23 5090.9,4253.23 5110.4,4253.23 cw(c5110.4,4211.5) 5139.91,4241.01 ; 4870,3811.9 4879.78,3811.9 4938.04,3811.9 4996.3,3811.9 ccw(c4996.3,3835.67) 5020.07,3835.67 cw(c5035.67,3835.67) 5035.67,3851.27 ccw(c5035.67,3875.04) 5059.44,3875.04 cw(c5075.04,3875.04) 5075.04,3890.64 ccw(c5075.04,3914.41) 5098.81,3914.41 cw(c5114.41,3914.41) 5114.41,3930.01 ccw(c5114.41,3953.78) 5138.18,3953.78 cw(c5153.78,3953.78) 5153.78,3969.38 ccw(c5153.78,3993.15) 5177.55,3993.15 cw(c5193.15,3993.15) 5193.15,4008.75 ccw(c5193.15,4032.52) 5216.92,4032.52 cw(c5232.52,4032.52) 5232.52,4048.12 ccw(c5232.52,4071.89) 5256.29,4071.89 5256.29,4091.45 ; v1(4924.52,4775.04) 4988.86,4775.04 ; v1@4928.41,4771.15 cw(c4937.8,4761.76) 4937.8,4775.04 cw(c4937.8,4788.32) v1@4928.41,4778.93 ; v1@4931.24,4768.32 cw(c4947.46,4752.11) 4947.46,4775.04 cw(c4947.46,4797.98) v1@4931.24,4781.76 ; v1@4982.14,4808.32 cw(c4965.92,4792.11) 4988.86,4792.11 cw(c5011.79,4792.11) v1@4995.57,4808.32 ; v1@4984.97,4811.15 cw(c4975.58,4801.76) 4988.86,4801.76 cw(c5002.14,4801.76) v1@4992.75,4811.15 ; v1(4988.86,4815.04) 4988.86,4775.04 ; 5011.9,3679.78 5011.9,3738.04 5011.9,3796.3 cw(c5035.67,3796.3) 5035.67,3820.07 ccw(c5035.67,3835.67) 5051.27,3835.67 cw(c5075.04,3835.67) 5075.04,3859.44 ccw(c5075.04,3875.04) 5090.64,3875.04 cw(c5114.41,3875.04) 5114.41,3898.81 ccw(c5114.41,3914.41) 5130.01,3914.41 cw(c5153.78,3914.41) 5153.78,3938.18 ccw(c5153.78,3953.78) 5169.38,3953.78 cw(c5193.15,3953.78) 5193.15,3977.55 ccw(c5193.15,3993.15) 5208.75,3993.15 cw(c5232.52,3993.15) 5232.52,4016.92 ccw(c5232.52,4032.52) 5248.12,4032.52 ; v3@5146.31,4228.72 ccw(c5128.27,4227.14) 5139.91,4241.01 ; v3@5153.13,4236.84 cw(c5151.55,4254.88) 5139.91,4241.01 ; 5248.03,4308.02 5248.03,4269.25 ccw(c5286.7,4269.25) 5259.36,4241.9 ; 5255.08,4049.33 ccw(c5271.89,4032.52) 5248.12,4032.52 ; 5256.38,4091.55 cw(c5266.53,4091.55) 5259.36,4098.73 ; v3@5264.55,4111.26 cw(c5246.82,4111.26) 5259.36,4098.73 ; v3@5264.55,4229.37 ccw(c5246.82,4229.37) 5259.36,4241.9 ; v3@5271.89,4103.92 ccw(c5271.89,4086.19) 5259.36,4098.73 ; v3@5271.89,4236.71 cw(c5271.89,4254.44) 5259.36,4241.9 ; 5271.98,4331.97 5310.75,4331.97 cw(c5310.75,4293.3) 5338.1,4320.64 ; 5291.45,4056.29 5271.89,4056.29 ccw(c5271.89,4032.52) 5248.12,4032.52 ; 5291.55,4056.38 ccw(c5291.55,4066.53) 5298.73,4059.36 ; v3@5343.29,4308.11 ccw(c5325.56,4308.11) 5338.1,4320.64 ; v3@5350.63,4315.45 cw(c5350.63,4333.18) 5338.1,4320.64 ; v1(5423.52,4755.71) v1@5426.19,4758.37 ; v3@5428.72,3946.31 cw(c5427.14,3928.27) 5441.01,3939.91 ; v3@5428.72,4433.69 ccw(c5427.14,4451.73) 5441.01,4440.09 ; v3@5429.37,4064.55 cw(c5429.37,4046.82) 5441.9,4059.36 ; v3@5436.71,4071.89 ccw(c5454.44,4071.89) 5441.9,4059.36 ; v3@5436.84,3953.13 ccw(c5454.88,3951.55) 5441.01,3939.91 ; v3@5436.84,4426.87 cw(c5454.88,4428.45) 5441.01,4440.09 ; 5453.23,4710 5453.23,4582.64 5453.23,4563.22 5453.23,4489.1 5453.23,4469.6 cw(c5411.5,4469.6) 5441.01,4440.09 ; 5453.23,4813.08 5456.86,4816.71 5458.56,4815 v1(5465,4815) ; 5488.45,4323.62 ccw(c5488.45,4313.47) 5481.27,4320.64 ; 5488.55,4323.71 5508.11,4323.71 ccw(c5508.11,4347.48) 5531.88,4347.48 ; 5508.02,4048.03 5469.25,4048.03 cw(c5469.25,4086.7) 5441.9,4059.36 ; v3@5508.11,4143.29 cw(c5508.11,4125.56) 5520.64,4138.1 ; v3@5508.11,4276.08 ccw(c5508.11,4293.81) 5520.64,4281.27 ; v1@5508.28,3603.28 ccw(c5492.06,3587.06) 5492.06,3610 ccw(c5492.06,3632.93) v1@5508.28,3616.72 ; v1@5511.11,3606.11 ccw(c5501.72,3596.72) 5501.72,3610 ccw(c5501.72,3623.28) v1@5511.11,3613.89 ; v1(5515,3610) 5486.31,3610 5453.23,3643.08 5453.23,3660 5453.23,3670 5453.23,3797.36 5453.23,3816.78 5453.23,3890.9 5453.23,3910.4 ccw(c5411.5,3910.4) 5441.01,3939.91 ; v3@5515.45,4150.63 ccw(c5533.18,4150.63) 5520.64,4138.1 ; v3@5515.45,4268.74 cw(c5533.18,4268.74) 5520.64,4281.27 ; 5523.62,4288.45 cw(c5513.47,4288.45) 5520.64,4281.27 ; 5523.71,4288.55 5523.71,4308.11 cw(c5547.48,4308.11) 5547.48,4331.88 ccw(c5547.48,4347.48) 5563.08,4347.48 cw(c5586.85,4347.48) 5586.85,4371.25 ccw(c5586.85,4386.85) 5602.45,4386.85 cw(c5626.22,4386.85) 5626.22,4410.62 ccw(c5626.22,4426.22) 5641.82,4426.22 cw(c5665.59,4426.22) 5665.59,4449.99 ccw(c5665.59,4465.59) 5681.19,4465.59 cw(c5704.96,4465.59) 5704.96,4489.36 ccw(c5704.96,4504.96) 5720.56,4504.96 cw(c5744.33,4504.96) 5744.33,4528.73 ccw(c5744.33,4544.33) 5759.93,4544.33 cw(c5783.7,4544.33) 5783.7,4568.1 5841.96,4568.1 5900.22,4568.1 5910,4568.1 5920,4568.1 ; 5524.92,4330.67 ccw(c5508.11,4347.48) 5531.88,4347.48 ; 5531.88,4071.89 ccw(c5547.48,4071.89) 5547.48,4056.29 cw(c5547.48,4032.52) 5571.25,4032.52 ccw(c5586.85,4032.52) 5586.85,4016.92 cw(c5586.85,3993.15) 5610.62,3993.15 ccw(c5626.22,3993.15) 5626.22,3977.55 cw(c5626.22,3953.78) 5649.99,3953.78 ccw(c5665.59,3953.78) 5665.59,3938.18 cw(c5665.59,3914.41) 5689.36,3914.41 ccw(c5704.96,3914.41) 5704.96,3898.81 cw(c5704.96,3875.04) 5728.73,3875.04 ccw(c5744.33,3875.04) 5744.33,3859.44 cw(c5744.33,3835.67) 5768.1,3835.67 ccw(c5783.7,3835.67) 5783.7,3820.07 5841.96,3820.07 5900.22,3820.07 5910,3820.07 5920,3820.07 5924.74,3820.07 5935.19,3820.07 5936.86,3818.4 5936.86,3683.04 v1(5961.52,3658.37) ; 5531.97,4071.98 5531.97,4110.75 ccw(c5493.3,4110.75) 5520.64,4138.1 ; v3@5626.87,4143.16 cw(c5628.45,4125.12) 5640.09,4138.99 ; v3@5633.69,4151.28 ccw(c5651.73,4152.86) 5640.09,4138.99 ; v3@5666.24,3985.68 cw(c5667.82,3967.64) 5679.46,3981.51 cw(c5691.1,3995.38) v3@5673.06,3993.8 ; 5679.17,3981.76 ccw(c5689.1,3991.69) 5689.1,3977.64 5782.64,3977.64 5910,3977.64 ; v1(5682.52,3603.71) 5728.71,3603.71 5759.93,3634.93 5759.93,3655.26 5759.93,3660 5759.93,3670 5759.93,3679.78 5759.93,3738.04 5759.93,3796.3 ccw(c5744.33,3796.3) 5744.33,3811.9 cw(c5744.33,3835.67) 5720.56,3835.67 ccw(c5704.96,3835.67) 5704.96,3851.27 cw(c5704.96,3875.04) 5681.19,3875.04 ccw(c5665.59,3875.04) 5665.59,3890.64 cw(c5665.59,3914.41) 5641.82,3914.41 ccw(c5626.22,3914.41) 5626.22,3930.01 cw(c5626.22,3953.78) 5602.45,3953.78 ccw(c5586.85,3953.78) 5586.85,3969.38 cw(c5586.85,3993.15) 5563.08,3993.15 ccw(c5547.48,3993.15) 5547.48,4008.75 cw(c5547.48,4032.52) 5523.71,4032.52 ; v1@5686.41,3599.82 cw(c5695.8,3590.43) 5695.8,3603.71 cw(c5695.8,3616.99) v1@5686.41,3607.6 ; v1@5689.24,3596.99 cw(c5705.46,3580.77) 5705.46,3603.71 cw(c5705.46,3626.64) v1@5689.24,3610.43 ; v1@5763.14,4824.32 cw(c5751.16,4812.35) 5768.1,4812.35 ; 5768.1,4803.87 cw(c5797.03,4803.87) v1@5776.57,4824.32 ; 5768.1,4813.52 cw(c5787.37,4813.52) v1@5773.75,4827.15 ; v1(5769.86,4831.04) 5768.1,4829.28 5768.1,4724.74 5768.1,4720 5768.1,4710 5768.1,4700.22 5768.1,4641.96 5768.1,4583.7 cw(c5744.33,4583.7) 5744.33,4559.93 ccw(c5744.33,4544.33) 5728.73,4544.33 cw(c5704.96,4544.33) 5704.96,4520.56 ccw(c5704.96,4504.96) 5689.36,4504.96 cw(c5665.59,4504.96) 5665.59,4481.19 ccw(c5665.59,4465.59) 5649.99,4465.59 cw(c5626.22,4465.59) 5626.22,4441.82 ccw(c5626.22,4426.22) 5610.62,4426.22 cw(c5586.85,4426.22) 5586.85,4402.45 ccw(c5586.85,4386.85) 5571.25,4386.85 cw(c5547.48,4386.85) 5547.48,4363.08 ccw(c5547.48,4347.48) 5531.88,4347.48 ; 5910,4126.77 5782.64,4126.77 5763.22,4126.77 5689.1,4126.77 5669.6,4126.77 cw(c5669.6,4168.5) 5640.09,4138.99 ; 5924.74,4568.1 5920,4568.1 ; v1@5952.02,3658.37 ccw(c5929.09,3658.37) 5945.31,3674.59 ccw(c5961.52,3690.81) v1@5961.52,3667.87 ; v1@5956.02,3658.37 ccw(c5942.75,3658.37) 5952.13,3667.76 ccw(c5961.52,3677.15) v1@5961.52,3663.87 ; v1@5958.47,4735.99 cw(c5942.26,4719.77) 5965.19,4719.77 cw(c5988.13,4719.77) v1@5971.91,4735.99 ; v1@5961.3,4738.82 cw(c5951.91,4729.43) 5965.19,4729.43 cw(c5978.47,4729.43) v1@5969.08,4738.82 ; v1(5965.19,4742.71) 5965.19,4691.71 ; v1@5991.81,4684.99 ccw(c5975.59,4668.77) 5975.59,4691.71 ccw(c5975.59,4714.64) v1@5991.81,4698.43 ; v1@5994.64,4687.82 ccw(c5985.25,4678.43) 5985.25,4691.71 ccw(c5985.25,4704.99) v1@5994.64,4695.6 ; 6078.67,4672.04 ccw(c6078.67,4724.57) v1@6115.81,4687.43 ; 6088.32,4672.04 ccw(c6088.32,4714.91) v1@6118.64,4684.6 ; 6097.98,4672.04 ccw(c6097.98,4705.25) v1@6121.46,4681.77 ; 6107.64,4672.04 ccw(c6107.64,4695.6) v1@6124.29,4678.94 ; v1(6122.52,4680.71) 6113.86,4672.04 6031.86,4672.04 6012.19,4691.71 v1(5998.52,4691.71) 5965.19,4691.71 ; 4988.86,4775.04 5015,4775.04 5020.19,4769.85 5020.19,4733.37 5020.07,4733.37 5020.07,4724.74 5020.07,4720 5020.07,4710 5020.07,4700.22 5020.07,4641.96 5020.07,4583.7 ccw(c5035.67,4583.7) 5035.67,4568.1 cw(c5035.67,4544.33) 5059.44,4544.33 ccw(c5075.04,4544.33) 5075.04,4528.73 cw(c5075.04,4504.96) 5098.81,4504.96 ccw(c5114.41,4504.96) 5114.41,4489.36 cw(c5114.41,4465.59) 5138.18,4465.59 ccw(c5153.78,4465.59) 5153.78,4449.99 cw(c5153.78,4426.22) 5177.55,4426.22 ccw(c5193.15,4426.22) 5193.15,4410.62 cw(c5193.15,4386.85) 5216.92,4386.85 ccw(c5232.52,4386.85) 5232.52,4371.25 cw(c5232.52,4347.48) 5256.29,4347.48 ; 5256.29,4347.48 ccw(c5271.89,4347.48) 5271.89,4331.88 cw(c5271.89,4347.48) 5256.29,4347.48 ; 5298.73,4059.36 cw(c5311.26,4046.82) 5311.26,4064.55 ccw(c5311.26,4046.82) 5298.73,4059.36 ; 5298.73,4059.36 ccw(c5286.19,4071.89) 5303.92,4071.89 cw(c5286.19,4071.89) 5298.73,4059.36 ; 5481.27,4320.64 ccw(c5493.81,4308.11) 5476.08,4308.11 cw(c5493.81,4308.11) 5481.27,4320.64 ; 5481.27,4320.64 cw(c5468.74,4333.18) 5468.74,4315.45 ccw(c5468.74,4333.18) 5481.27,4320.64 ; 5523.71,4032.52 ccw(c5508.11,4032.52) 5508.11,4048.12 cw(c5508.11,4032.52) 5523.71,4032.52 ; 5920,4568.1 5925.29,4568.1 5929.19,4572 5929.19,4655.71 ; 5929.19,4655.71 5950.66,4677.17 ; 5929.19,4655.71 5950.66,4677.17 ; 5929.19,4655.71 5961.7,4688.22 ; 5950.66,4677.17 5961.7,4688.22 ; 5950.66,4677.17 5961.7,4688.22 ; 5961.7,4688.22 5965.19,4691.71 ; 5961.7,4688.22 5965.19,4691.71
  MidLayer2 w5: v2(6734.41,1786.26) 6734.41,1774.47 6754.28,1754.6 6754.28,1699.44 6765.7,1688.02 6781.49,1688.02 6793.28,1676.23 6793.28,1658.28 ; v2@6734.87,1786.07 ccw(c6747.56,1780.76) 6737.84,1771.04 ; v2@6739.48,1784.14 ccw(c6755,1777.66) 6743.11,1765.77 ; v2@6744.1,1782.21 ccw(c6762.44,1774.55) 6748.38,1760.49 ; v2(6773.78,1628.78) 6773.78,1638.78 6793.28,1658.28 ; v2@6774.27,1628.86 cw(c6792.07,1631.61) 6779.34,1644.34 ; v2@6779.22,1629.62 cw(c6804.14,1633.47) 6786.31,1651.31 ; v2@6784.16,1630.38 cw(c6816.22,1635.34) 6793.28,1658.28 ; v2@6852.52,2208.83 cw(c6852.52,2183.48) 6870.44,2201.41 cw(c6888.37,2219.33) v2@6863.02,2219.33 ; v2@6852.52,2213.83 cw(c6852.52,2200.55) 6861.91,2209.94 cw(c6871.3,2219.33) v2@6858.02,2219.33 ; v2(6852.52,2219.33) 6872.02,2199.83 6872.02,2132.88 6883.81,2121.09 6951.13,2121.09 v2(6970.63,2140.59) ; v2(6891.89,1746.89) 6903.68,1746.89 6923.18,1727.39 6992.61,1727.39 7006.8,1713.2 7006.8,1659.56 7029.87,1636.49 ; v2@6891.89,1972.61 cw(c6891.89,1947.26) 6909.81,1965.19 cw(c6927.74,1983.11) v2@6902.39,1983.11 ; v2@6891.89,1977.61 cw(c6891.89,1964.33) 6901.28,1973.72 cw(c6910.67,1983.11) v2@6897.39,1983.11 ; v2(6891.89,1983.11) 6911.39,1963.61 6950.76,1963.61 v2(6970.63,1943.74) ; v2@6891.9,1746.39 cw(c6892.45,1718.09) 6912.47,1738.1 ; v2@6892,1741.39 cw(c6892.77,1701.8) 6920.77,1729.8 ; v2@6960.13,1943.74 ccw(c6934.78,1943.74) 6952.71,1961.66 ccw(c6970.63,1979.59) v2@6970.63,1954.24 ; v2@6960.13,2140.59 cw(c6934.78,2140.59) 6952.71,2122.67 cw(c6970.63,2104.74) v2@6970.63,2130.09 ; v2@6965.13,1943.74 ccw(c6951.85,1943.74) 6961.24,1953.13 ccw(c6970.63,1962.52) v2@6970.63,1949.24 ; v2@6965.13,2140.59 cw(c6951.85,2140.59) 6961.24,2131.2 cw(c6970.63,2121.81) v2@6970.63,2135.09 ; v2@7038.87,1589.41 ccw(c7013.52,1589.41) 7031.45,1607.33 ccw(c7049.37,1625.26) v2@7049.37,1599.91 ; v2@7043.87,1589.41 ccw(c7030.59,1589.41) 7039.98,1598.8 ccw(c7049.37,1608.19) v2@7049.37,1594.91 ; v2(7049.37,1589.41) 7048.78,1590 7029.87,1608.91 7029.87,1636.49 ; v2@7117.61,1746.89 cw(c7092.26,1746.89) 7110.19,1728.97 cw(c7128.11,1711.04) v2@7128.11,1736.39 ; v2@7122.61,1746.89 cw(c7109.33,1746.89) 7118.72,1737.5 cw(c7128.11,1728.11) v2@7128.11,1741.39 ; v2(7128.11,1746.89) 7108.61,1727.39 7032.48,1727.39 7029.87,1730 ; 7217.34,1769.17 cw(c7245.34,1741.17) v2@7246.11,1780.76 ; 7225.64,1777.47 cw(c7245.66,1757.46) v2@7246.21,1785.76 ; v2(7246.22,1786.26) 7234.43,1786.26 7214.93,1766.76 7041.66,1766.76 7029.87,1754.97 7029.87,1730 ; v2@7353.83,1707.52 ccw(c7328.48,1707.52) 7346.41,1725.44 ccw(c7364.33,1743.37) v2@7364.33,1718.02 ; v2@7358.83,1707.52 ccw(c7345.55,1707.52) 7354.94,1716.91 ccw(c7364.33,1726.3) v2@7364.33,1713.02 ; v2(7364.33,1707.52) 7345,1726.85 7345,1738.64 7344.83,1738.81 7344.83,1804.83 7346.13,1806.13 7372.41,1806.13 7391.91,1825.63 v2@7394.22,1825.63 ; 7029.87,1636.49 7029.87,1730
  MidLayer2 w8: v2@7394.22,1825.63 v2(7403.7,1825.63)
  MidLayer2 w12: v1@5150.86,3552.87 cw(c5150.86,3504.99) 5184.71,3538.85 ; v1(5150.86,3558.37) 5165.19,3558.37 v1(5273.52,3450.04) ; v1@5150.86,3564.87 cw(c5150.86,3545.96) 5164.23,3559.34 ; v1@5268.02,3450.04 ccw(c5254.75,3450.04) 5264.14,3459.43 ccw(c5273.52,3468.82) v1@5273.52,3455.54 ; v1@5419.64,4759.6 ccw(c5410.25,4768.99) 5423.52,4768.99 ccw(c5436.8,4768.99) v1@5427.41,4759.6 ; v1(5423.52,4755.71) 5423.52,4783.37 5456.86,4816.71 5479.89,4816.71 5513.18,4850 5583.23,4850 v1(5596.19,4837.04) ; 5438.79,4798.65 cw(c5465,4772.44) v1@5465,4809.5 ; v1@5465,4808.5 ccw(c5465,4824.62) 5476.4,4813.22 ; v1@5465,4820.5 ccw(c5465,4865.59) 5496.89,4833.71 ; v1(5765.34,1642.37) 5816.19,1642.37 v1(5825.19,1633.37) ; v1@5769.22,1638.49 cw(c5778.61,1629.1) 5778.61,1642.37 cw(c5778.61,1655.65) v1@5769.22,1646.26 ; 5790.18,1642.37 cw(c5790.18,1598.37) v1@5821.3,1629.49 ; v4(6020,2955) v4@6020,2960 ; v2(6970.63,1471.3) 6965.19,1471.3 6965.19,1475.04 6981.86,1475.04 6998.52,1491.71 6998.52,1558.37 7030.15,1590 7048.78,1590 v2@7050,1590 ; v2@6970.63,1478.3 ccw(c6970.63,1513.27) 6995.36,1488.54 ; 7031.04,1590 cw(c7031.04,1571.08) v2@7044.42,1584.46 ; 7033.9,1590 ccw(c7033.9,1604.88) v2@7044.42,1594.36 ; v5(7297,838.58) 7298.52,838.58 v5@7297.76,839.34 ; v1(7457.52,3024.37) v1@7458.19,3025.04